# Altium PCB Teclado_V2.PcbDoc (part 1 of 2)
Units mm, origin at the board's own origin, x right, y up, seen from the top; angles counter-clockwise.
Board outline 315 x 134.96 mm, 2 copper layers (Top Layer, Bottom Layer); 272 components, 196 nets, 917 pads, 600 vias.
Unrouted connection lines stored in the file: 43.
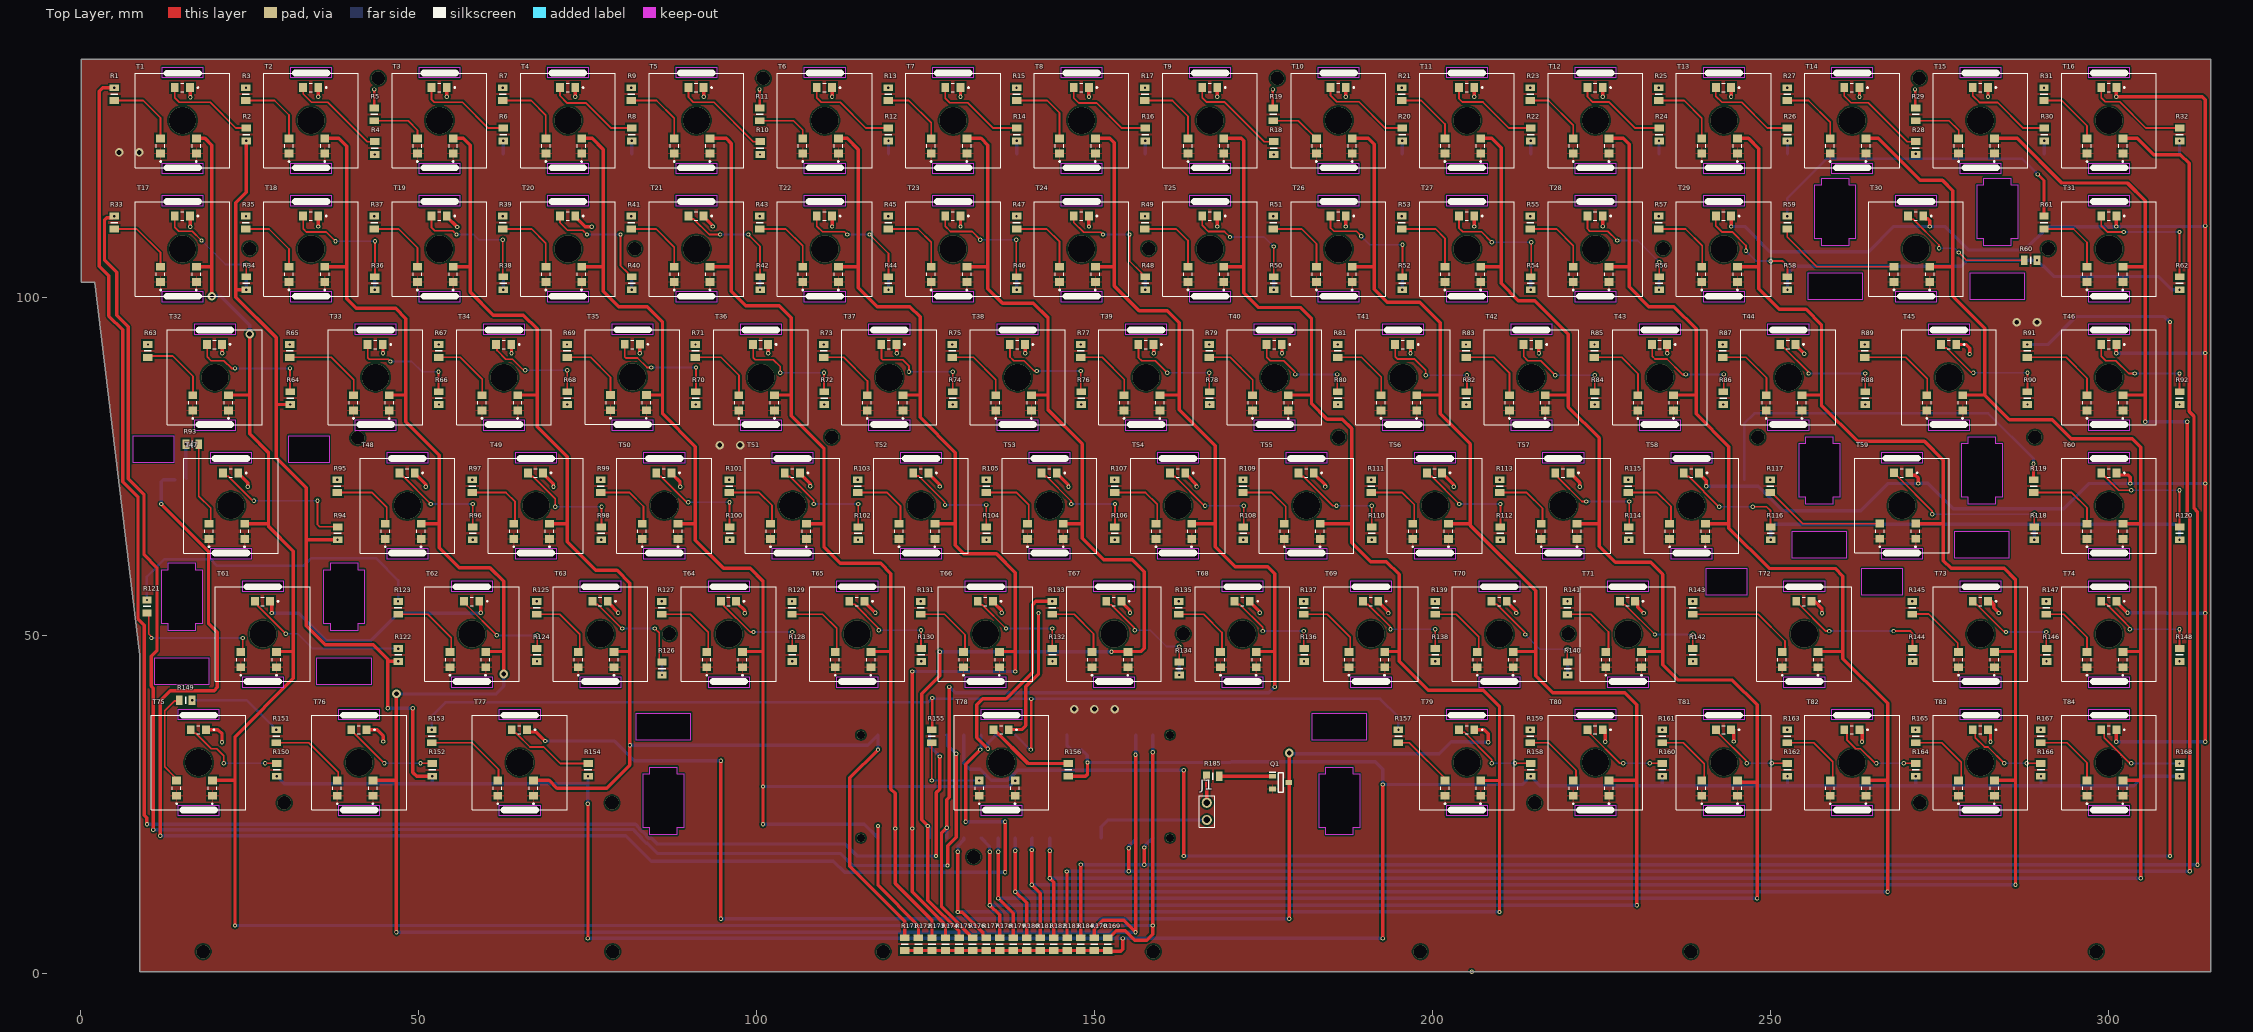
[diagram p0: Top Layer view]
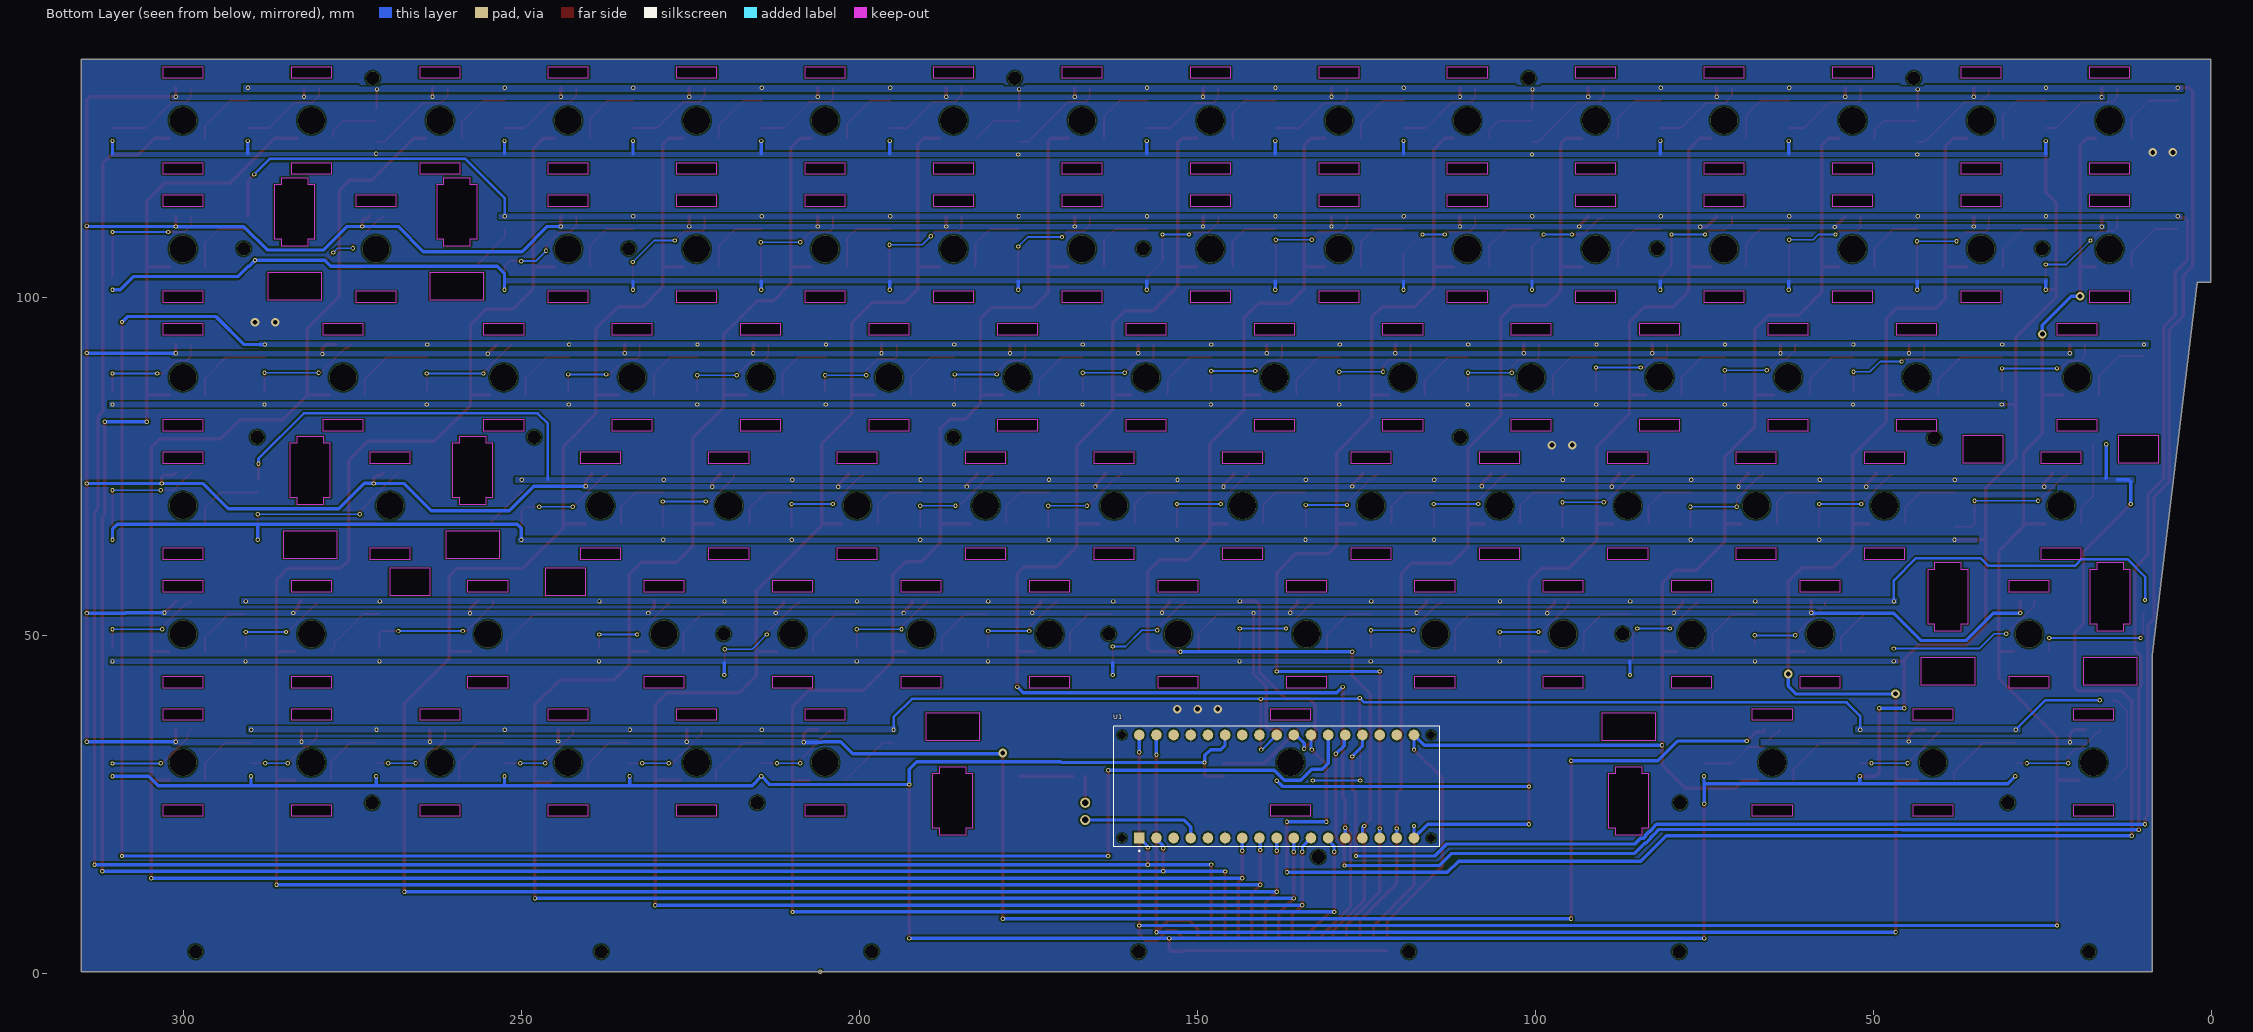
[diagram p1: Bottom Layer view, seen from below]

## Layer stack, top to bottom
Top Solder: solder mask 0.0102, Solder Resist, Dk 3.5
Top Layer: signal copper 0.0356
Dielectric 1: dielectric 0.32, FR-4, Dk 4.8
Bottom Layer: signal copper 0.0356
Bottom Solder: solder mask 0.0102, Solder Resist, Dk 3.5

## Board outline
0.127,102.282 2.127,102.282 8.731,47.14 8.731,0.321 315.127,0.321 315.127,135.282 0.127,135.282
cut-out: 240.519,59.982 246.519,59.982 246.519,55.982 240.519,55.982
cut-out: 263.529,59.982 269.529,59.982 269.529,55.982 263.529,55.982
cut-out: 257.564,117.722 261.564,117.722 261.564,116.722 262.564,116.722 262.564,108.722 261.564,108.722 261.564,107.722 257.564,107.722 257.564,108.722 256.564,108.722 256.564,116.722 257.564,116.722
cut-out: 255.565,103.722 263.565,103.722 263.565,99.722 255.565,99.722
cut-out: 7.793,79.618 13.793,79.618 13.793,75.618 7.793,75.618
cut-out: 188.221,20.582 184.221,20.582 184.221,21.582 183.221,21.582 183.221,29.582 184.221,29.582 184.221,30.582 188.221,30.582 188.221,29.582 189.221,29.582 189.221,21.582 188.221,21.582
cut-out: 190.221,34.582 182.221,34.582 182.221,38.582 190.221,38.582
cut-out: 255.257,79.482 259.257,79.482 259.257,78.482 260.257,78.482 260.257,70.482 259.257,70.482 259.257,69.482 255.257,69.482 255.257,70.482 254.257,70.482 254.257,78.482 255.257,78.482
cut-out: 277.281,65.482 285.281,65.482 285.281,61.482 277.281,61.482
cut-out: 279.281,79.482 283.281,79.482 283.281,78.482 284.281,78.482 284.281,70.482 283.281,70.482 283.281,69.482 279.281,69.482 279.281,70.482 278.281,70.482 278.281,78.482 279.281,78.482
cut-out: 281.569,117.722 285.569,117.722 285.569,116.722 286.569,116.722 286.569,108.722 285.569,108.722 285.569,107.722 281.569,107.722 281.569,108.722 280.569,108.722 280.569,116.722 281.569,116.722
cut-out: 279.569,103.722 287.569,103.722 287.569,99.722 279.569,99.722
cut-out: 253.257,65.482 261.257,65.482 261.257,61.482 253.257,61.482
cut-out: 36.985,60.782 40.985,60.782 40.985,59.782 41.985,59.782 41.985,51.782 40.985,51.782 40.985,50.782 36.985,50.782 36.985,51.782 35.985,51.782 35.985,59.782 36.985,59.782
cut-out: 12.985,60.782 16.985,60.782 16.985,59.782 17.985,59.782 17.985,51.782 16.985,51.782 16.985,50.782 12.985,50.782 12.985,51.782 11.985,51.782 11.985,59.782 12.985,59.782
cut-out: 34.985,46.782 42.985,46.782 42.985,42.782 34.985,42.782
cut-out: 30.793,79.618 36.793,79.618 36.793,75.618 30.793,75.618
cut-out: 10.985,46.782 18.985,46.782 18.985,42.782 10.985,42.782
cut-out: 88.235,20.582 84.235,20.582 84.235,21.582 83.235,21.582 83.235,29.582 84.235,29.582 84.235,30.582 88.235,30.582 88.235,29.582 89.235,29.582 89.235,21.582 88.235,21.582
cut-out: 90.235,34.582 82.235,34.582 82.235,38.582 90.235,38.582

## Design rules (kind name [scope] priority, off if disabled: settings)
Clearance [All] p1: gap=0.254 ignorepadtopadclearanceinfootprint=FALSE except(0: Arc-Hole Track-Hole SMDPad-Hole THPad-Hole Via-Hole Fill-Hole Poly-Hole Region-Hole Text-Hole)
PlaneConnect [All] p1: planeconnectstyle=Direct reliefexpansion=0.508 reliefentries=4 reliefconductorwidth=0.254 reliefairgap=0.254
PolygonConnect [All] p1: thpad.connectstyle=Relief thpad.reliefconductorwidth=0.254 thpad.reliefentries=4 thpad.polygonreliefangle="90 Angle" thpad.airgapwidth=0.254 smdpad.connectstyle=Relief smdpad.reliefconductorwidth=0.254 smdpad.reliefentries=4 smdpad.polygonreliefangle="90 Angle" smdpad.airgapwidth=0.254 via.connectstyle=Direct via.reliefconductorwidth=0.254 via.reliefentries=4 via.polygonreliefangle="90 Angle" via.airgapwidth=0.254
RoutingVias [All] p1: holewidth=0.35 width=0.635 viastyle="Through Hole" minholewidth=0.35 minwidth=0.635 maxholewidth=0.711 maxwidth=1.27
SolderMaskExpansion [All] p1: expansion=0.102 istentingtop=FALSE
Width [All] p1: maxlimit=0.5 minlimit=0.254 preferedwidth=0.254 minimp=50.000000 maximp=50.000000 favimp=50.000000
29 further rules are at their usual default settings.

## Components (designator, comment, footprint, x,y, rotation, side; value= is the part's Value field where it differs from the comment)
J1 "2P" 2P 166.624,25.301 r270 top
Q1 "MMBT2222A" MMBT2222A 176.088,28.288 r0 top
R1 "500" "Res 0805" 5,130.155 r90 top
R2 "560" "Res 0805" 24.5,124.155 r270 top
R3 "500" "Res 0805" 24.5,130.155 r90 top
R4 "560" "Res 0805" 43.5,122.155 r270 top
R5 "500" "Res 0805" 43.5,127.155 r90 top
R6 "560" "Res 0805" 62.5,124.155 r270 top
R7 "500" "Res 0805" 62.5,130.155 r90 top
R8 "560" "Res 0805" 81.5,124.155 r270 top
R9 "500" "Res 0805" 81.5,130.155 r90 top
R10 "560" "Res 0805" 100.5,122.155 r270 top
R11 "500" "Res 0805" 100.5,127.155 r90 top
R12 "560" "Res 0805" 119.5,124.155 r270 top
R13 "500" "Res 0805" 119.5,130.155 r90 top
R14 "560" "Res 0805" 138.5,124.155 r270 top
R15 "500" "Res 0805" 138.5,130.155 r90 top
R16 "560" "Res 0805" 157.5,124.155 r270 top
R17 "500" "Res 0805" 157.5,130.155 r90 top
R18 "560" "Res 0805" 176.5,122.155 r270 top
R19 "500" "Res 0805" 176.5,127.155 r90 top
R20 "560" "Res 0805" 195.5,124.155 r270 top
R21 "500" "Res 0805" 195.5,130.155 r90 top
R22 "560" "Res 0805" 214.5,124.155 r270 top
R23 "500" "Res 0805" 214.5,130.155 r90 top
R24 "560" "Res 0805" 233.5,124.155 r270 top
R25 "500" "Res 0805" 233.5,130.155 r90 top
R26 "560" "Res 0805" 252.5,124.155 r270 top
R27 "500" "Res 0805" 252.5,130.155 r90 top
R28 "560" "Res 0805" 271.5,122.155 r270 top
R29 "500" "Res 0805" 271.5,127.155 r90 top
R30 "560" "Res 0805" 290.5,124.155 r270 top
R31 "500" "Res 0805" 290.5,130.155 r90 top
R32 "560" "Res 0805" 310.5,124.155 r270 top
R33 "500" "Res 0805" 5,111.155 r90 top
R34 "560" "Res 0805" 24.5,102.155 r270 top
R35 "500" "Res 0805" 24.5,111.155 r90 top
R36 "560" "Res 0805" 43.5,102.155 r270 top
R37 "500" "Res 0805" 43.5,111.155 r90 top
R38 "560" "Res 0805" 62.5,102.155 r270 top
R39 "500" "Res 0805" 62.5,111.155 r90 top
R40 "560" "Res 0805" 81.5,102.155 r270 top
R41 "500" "Res 0805" 81.5,111.155 r90 top
R42 "560" "Res 0805" 100.5,102.155 r270 top
R43 "500" "Res 0805" 100.5,111.155 r90 top
R44 "560" "Res 0805" 119.5,102.155 r270 top
R45 "500" "Res 0805" 119.5,111.155 r90 top
R46 "560" "Res 0805" 138.5,102.155 r270 top
R47 "500" "Res 0805" 138.5,111.155 r90 top
R48 "560" "Res 0805" 157.5,102.155 r270 top
R49 "500" "Res 0805" 157.5,111.155 r90 top
R50 "560" "Res 0805" 176.5,102.155 r270 top
R51 "500" "Res 0805" 176.5,111.155 r90 top
R52 "560" "Res 0805" 195.5,102.155 r270 top
R53 "500" "Res 0805" 195.5,111.155 r90 top
R54 "560" "Res 0805" 214.5,102.155 r270 top
R55 "500" "Res 0805" 214.5,111.155 r90 top
R56 "560" "Res 0805" 233.5,102.155 r270 top
R57 "500" "Res 0805" 233.5,111.155 r90 top
R58 "560" "Res 0805" 252.5,102.155 r270 top
R59 "500" "Res 0805" 252.5,111.155 r90 top
R60 "560" "Res 0805" 288.5,105.539 r0 top
R61 "500" "Res 0805" 290.5,111.155 r90 top
R62 "560" "Res 0805" 310.5,102.155 r270 top
R63 "500" "Res 0805" 10,92.155 r90 top
R64 "560" "Res 0805" 31,85.155 r270 top
R65 "500" "Res 0805" 31,92.155 r90 top
R66 "560" "Res 0805" 53,85.155 r270 top
R67 "500" "Res 0805" 53,92.155 r90 top
R68 "560" "Res 0805" 72,85.155 r270 top
R69 "500" "Res 0805" 72,92.155 r90 top
R70 "560" "Res 0805" 91,85.155 r270 top
R71 "500" "Res 0805" 91,92.155 r90 top
R72 "560" "Res 0805" 110,85.155 r270 top
R73 "500" "Res 0805" 110,92.155 r90 top
R74 "560" "Res 0805" 129,85.155 r270 top
R75 "500" "Res 0805" 129,92.155 r90 top
R76 "560" "Res 0805" 148,85.155 r270 top
R77 "500" "Res 0805" 148,92.155 r90 top
R78 "560" "Res 0805" 167,85.155 r270 top
R79 "500" "Res 0805" 167,92.155 r90 top
R80 "560" "Res 0805" 186,85.155 r270 top
R81 "500" "Res 0805" 186,92.155 r90 top
R82 "560" "Res 0805" 205,85.155 r270 top
R83 "500" "Res 0805" 205,92.155 r90 top
R84 "560" "Res 0805" 224,85.155 r270 top
R85 "500" "Res 0805" 224,92.155 r90 top
R86 "560" "Res 0805" 243,85.155 r270 top
R87 "500" "Res 0805" 243,92.155 r90 top
R88 "560" "Res 0805" 264,85.155 r270 top
R89 "500" "Res 0805" 264,92.155 r90 top
R90 "560" "Res 0805" 288,85.155 r270 top
R91 "500" "Res 0805" 288,92.155 r90 top
R92 "560" "Res 0805" 310.5,85.155 r270 top
R93 "500" "Res 0805" 16.526,78.362 r180 top
R94 "560" "Res 0805" 38,65.155 r270 top
R95 "500" "Res 0805" 38,72.155 r90 top
R96 "560" "Res 0805" 58,65.155 r270 top
R97 "500" "Res 0805" 58,72.155 r90 top
R98 "560" "Res 0805" 77,65.155 r270 top
R99 "500" "Res 0805" 77,72.155 r90 top
R100 "560" "Res 0805" 96,65.155 r270 top
R101 "500" "Res 0805" 96,72.155 r90 top
R102 "560" "Res 0805" 115,65.155 r270 top
R103 "500" "Res 0805" 115,72.155 r90 top
R104 "560" "Res 0805" 134,65.155 r270 top
R105 "500" "Res 0805" 134,72.155 r90 top
R106 "560" "Res 0805" 153,65.155 r270 top
R107 "500" "Res 0805" 153,72.155 r90 top
R108 "560" "Res 0805" 172,65.155 r270 top
R109 "500" "Res 0805" 172,72.155 r90 top
R110 "560" "Res 0805" 191,65.155 r270 top
R111 "500" "Res 0805" 191,72.155 r90 top
R112 "560" "Res 0805" 210,65.155 r270 top
R113 "500" "Res 0805" 210,72.155 r90 top
R114 "560" "Res 0805" 229,65.155 r270 top
R115 "500" "Res 0805" 229,72.155 r90 top
R116 "560" "Res 0805" 250,65.155 r270 top
R117 "500" "Res 0805" 250,72.155 r90 top
R118 "560" "Res 0805" 289,65.155 r270 top
R119 "500" "Res 0805" 289,72.155 r90 top
R120 "560" "Res 0805" 310.5,65.155 r270 top
R121 "500" "Res 0805" 9.86,54.356 r90 top
R122 "560" "Res 0805" 47,47.155 r270 top
R123 "500" "Res 0805" 47,54.155 r90 top
R124 "560" "Res 0805" 67.5,47.155 r270 top
R125 "500" "Res 0805" 67.5,54.155 r90 top
R126 "560" "Res 0805" 86,45.155 r270 top
R127 "500" "Res 0805" 86,54.155 r90 top
R128 "560" "Res 0805" 105.283,47.155 r270 top
R129 "500" "Res 0805" 105.283,54.155 r90 top
R130 "560" "Res 0805" 124.341,47.155 r270 top
R131 "500" "Res 0805" 124.341,54.155 r90 top
R132 "560" "Res 0805" 143.764,47.155 r270 top
R133 "500" "Res 0805" 143.764,54.155 r90 top
R134 "560" "Res 0805" 162.5,45.155 r270 top
R135 "500" "Res 0805" 162.5,54.155 r90 top
R136 "560" "Res 0805" 180.983,47.155 r270 top
R137 "500" "Res 0805" 180.983,54.155 r90 top
R138 "560" "Res 0805" 200.414,47.155 r270 top
R139 "500" "Res 0805" 200.414,54.155 r90 top
R140 "560" "Res 0805" 220,45.155 r270 top
R141 "500" "Res 0805" 220,54.155 r90 top
R142 "560" "Res 0805" 238.514,47.155 r270 top
R143 "500" "Res 0805" 238.514,54.155 r90 top
R144 "560" "Res 0805" 271,47.155 r270 top
R145 "500" "Res 0805" 271,54.155 r90 top
R146 "560" "Res 0805" 290.83,47.155 r270 top
R147 "500" "Res 0805" 290.83,54.155 r90 top
R148 "560" "Res 0805" 310.5,47.155 r270 top
R149 "500" "Res 0805" 15.571,40.442 r0 top
R150 "560" "Res 0805" 29,30.155 r270 top
R151 "500" "Res 0805" 29,35.155 r90 top
R152 "560" "Res 0805" 52,30.155 r270 top
R153 "500" "Res 0805" 52,35.155 r90 top
R154 "560" "Res 0805" 75.057,30.155 r270 top
R155 "500" "Res 0805" 125.953,35.155 r90 top
R156 "560" "Res 0805" 146.117,30.155 r270 top
R157 "500" "Res 0805" 195,35.155 r90 top
R158 "560" "Res 0805" 214.5,30.155 r270 top
R159 "500" "Res 0805" 214.5,35.155 r90 top
R160 "560" "Res 0805" 234,30.155 r270 top
R161 "500" "Res 0805" 234,35.155 r90 top
R162 "560" "Res 0805" 252.5,30.155 r270 top
R163 "500" "Res 0805" 252.5,35.155 r90 top
R164 "560" "Res 0805" 271.5,30.155 r270 top
R165 "500" "Res 0805" 271.5,35.155 r90 top
R166 "560" "Res 0805" 290,30.155 r270 top
R167 "500" "Res 0805" 290,35.155 r90 top
R168 "560" "Res 0805" 310.5,30.155 r270 top
R169 "10k" "Res 0805" 151.991,4.409 r90 top
R170 "10k" "Res 0805" 149.991,4.409 r90 top
R171 "10k" "Res 0805" 121.991,4.409 r90 top
R172 "10k" "Res 0805" 123.991,4.409 r90 top
R173 "10k" "Res 0805" 125.991,4.409 r90 top
R174 "10k" "Res 0805" 127.991,4.409 r90 top
R175 "10k" "Res 0805" 129.991,4.409 r90 top
R176 "10k" "Res 0805" 131.991,4.409 r90 top
R177 "10k" "Res 0805" 133.991,4.409 r90 top
R178 "10k" "Res 0805" 135.991,4.409 r90 top
R179 "10k" "Res 0805" 137.991,4.409 r90 top
R180 "10k" "Res 0805" 139.991,4.409 r90 top
R181 "10k" "Res 0805" 141.991,4.409 r90 top
R182 "10k" "Res 0805" 143.991,4.409 r90 top
R183 "10k" "Res 0805" 145.991,4.409 r90 top
R184 "10k" "Res 0805" 147.991,4.409 r90 top
R185 "1k" "Res 0805" 167.513,29.238 r180 top
T1 "Interruptor óptico Keychron de bajo perfil" "Interruptor óptico Keychron de bajo perfil" 8.105,119.246 r0 top
T2 "Interruptor óptico Keychron de bajo perfil" "Interruptor óptico Keychron de bajo perfil" 27.104,119.25 r0 top
T3 "Interruptor óptico Keychron de bajo perfil" "Interruptor óptico Keychron de bajo perfil" 46.104,119.25 r0 top
T4 "Interruptor óptico Keychron de bajo perfil" "Interruptor óptico Keychron de bajo perfil" 65.104,119.25 r0 top
T5 "Interruptor óptico Keychron de bajo perfil" "Interruptor óptico Keychron de bajo perfil" 84.104,119.25 r0 top
T6 "Interruptor óptico Keychron de bajo perfil" "Interruptor óptico Keychron de bajo perfil" 103.104,119.25 r0 top
T7 "Interruptor óptico Keychron de bajo perfil" "Interruptor óptico Keychron de bajo perfil" 122.104,119.25 r0 top
T8 "Interruptor óptico Keychron de bajo perfil" "Interruptor óptico Keychron de bajo perfil" 141.104,119.25 r0 top
T9 "Interruptor óptico Keychron de bajo perfil" "Interruptor óptico Keychron de bajo perfil" 160.104,119.25 r0 top
T10 "Interruptor óptico Keychron de bajo perfil" "Interruptor óptico Keychron de bajo perfil" 179.104,119.25 r0 top
T11 "Interruptor óptico Keychron de bajo perfil" "Interruptor óptico Keychron de bajo perfil" 198.104,119.25 r0 top
T12 "Interruptor óptico Keychron de bajo perfil" "Interruptor óptico Keychron de bajo perfil" 217.104,119.25 r0 top
T13 "Interruptor óptico Keychron de bajo perfil" "Interruptor óptico Keychron de bajo perfil" 236.104,119.25 r0 top
T14 "Interruptor óptico Keychron de bajo perfil" "Interruptor óptico Keychron de bajo perfil" 255.104,119.25 r0 top
T15 "Interruptor óptico Keychron de bajo perfil" "Interruptor óptico Keychron de bajo perfil" 274.104,119.25 r0 top
T16 "Interruptor óptico Keychron de bajo perfil" "Interruptor óptico Keychron de bajo perfil" 293.106,119.25 r0 top
T17 "Interruptor óptico Keychron de bajo perfil" "Interruptor óptico Keychron de bajo perfil" 8.103,100.244 r0 top
T18 "Interruptor óptico Keychron de bajo perfil" "Interruptor óptico Keychron de bajo perfil" 27.104,100.25 r0 top
T19 "Interruptor óptico Keychron de bajo perfil" "Interruptor óptico Keychron de bajo perfil" 46.104,100.248 r0 top
T20 "Interruptor óptico Keychron de bajo perfil" "Interruptor óptico Keychron de bajo perfil" 65.104,100.25 r0 top
T21 "Interruptor óptico Keychron de bajo perfil" "Interruptor óptico Keychron de bajo perfil" 84.104,100.25 r0 top
T22 "Interruptor óptico Keychron de bajo perfil" "Interruptor óptico Keychron de bajo perfil" 103.104,100.25 r0 top
T23 "Interruptor óptico Keychron de bajo perfil" "Interruptor óptico Keychron de bajo perfil" 122.104,100.25 r0 top
T24 "Interruptor óptico Keychron de bajo perfil" "Interruptor óptico Keychron de bajo perfil" 141.104,100.25 r0 top
T25 "Interruptor óptico Keychron de bajo perfil" "Interruptor óptico Keychron de bajo perfil" 160.104,100.25 r0 top
T26 "Interruptor óptico Keychron de bajo perfil" "Interruptor óptico Keychron de bajo perfil" 179.104,100.25 r0 top
T27 "Interruptor óptico Keychron de bajo perfil" "Interruptor óptico Keychron de bajo perfil" 198.104,100.25 r0 top
T28 "Interruptor óptico Keychron de bajo perfil" "Interruptor óptico Keychron de bajo perfil" 217.104,100.25 r0 top
T29 "Interruptor óptico Keychron de bajo perfil" "Interruptor óptico Keychron de bajo perfil" 236.104,100.25 r0 top
T30 "Interruptor óptico Keychron de bajo perfil" "Interruptor óptico Keychron de bajo perfil" 264.544,100.25 r0 top
T31 "Interruptor óptico Keychron de bajo perfil" "Interruptor óptico Keychron de bajo perfil" 293.104,100.25 r0 top
T32 "Interruptor óptico Keychron de bajo perfil" "Interruptor óptico Keychron de bajo perfil" 12.864,81.25 r0 top
T33 "Interruptor óptico Keychron de bajo perfil" "Interruptor óptico Keychron de bajo perfil" 36.644,81.25 r0 top
T34 "Interruptor óptico Keychron de bajo perfil" "Interruptor óptico Keychron de bajo perfil" 55.644,81.25 r0 top
T35 "Interruptor óptico Keychron de bajo perfil" "Interruptor óptico Keychron de bajo perfil" 74.675,81.275 r0 top
T36 "Interruptor óptico Keychron de bajo perfil" "Interruptor óptico Keychron de bajo perfil" 93.644,81.25 r0 top
T37 "Interruptor óptico Keychron de bajo perfil" "Interruptor óptico Keychron de bajo perfil" 112.644,81.25 r0 top
T38 "Interruptor óptico Keychron de bajo perfil" "Interruptor óptico Keychron de bajo perfil" 131.646,81.25 r0 top
T39 "Interruptor óptico Keychron de bajo perfil" "Interruptor óptico Keychron de bajo perfil" 150.644,81.25 r0 top
T40 "Interruptor óptico Keychron de bajo perfil" "Interruptor óptico Keychron de bajo perfil" 169.644,81.25 r0 top
T41 "Interruptor óptico Keychron de bajo perfil" "Interruptor óptico Keychron de bajo perfil" 188.644,81.25 r0 top
T42 "Interruptor óptico Keychron de bajo perfil" "Interruptor óptico Keychron de bajo perfil" 207.644,81.25 r0 top
T43 "Interruptor óptico Keychron de bajo perfil" "Interruptor óptico Keychron de bajo perfil" 226.644,81.25 r0 top
T44 "Interruptor óptico Keychron de bajo perfil" "Interruptor óptico Keychron de bajo perfil" 245.644,81.25 r0 top
T45 "Interruptor óptico Keychron de bajo perfil" "Interruptor óptico Keychron de bajo perfil" 269.404,81.25 r0 top
T46 "Interruptor óptico Keychron de bajo perfil" "Interruptor óptico Keychron de bajo perfil" 293.106,81.25 r0 top
T47 "Interruptor óptico Keychron de bajo perfil" "Interruptor óptico Keychron de bajo perfil" 15.255,62.25 r0 top
T48 "Interruptor óptico Keychron de bajo perfil" "Interruptor óptico Keychron de bajo perfil" 41.354,62.25 r0 top
T49 "Interruptor óptico Keychron de bajo perfil" "Interruptor óptico Keychron de bajo perfil" 60.354,62.25 r0 top
T50 "Interruptor óptico Keychron de bajo perfil" "Interruptor óptico Keychron de bajo perfil" 79.356,62.25 r0 top
T51 "Interruptor óptico Keychron de bajo perfil" "Interruptor óptico Keychron de bajo perfil" 98.354,62.25 r0 top
T52 "Interruptor óptico Keychron de bajo perfil" "Interruptor óptico Keychron de bajo perfil" 117.356,62.25 r0 top
T53 "Interruptor óptico Keychron de bajo perfil" "Interruptor óptico Keychron de bajo perfil" 136.354,62.25 r0 top
T54 "Interruptor óptico Keychron de bajo perfil" "Interruptor óptico Keychron de bajo perfil" 155.354,62.25 r0 top
T55 "Interruptor óptico Keychron de bajo perfil" "Interruptor óptico Keychron de bajo perfil" 174.354,62.25 r0 top
T56 "Interruptor óptico Keychron de bajo perfil" "Interruptor óptico Keychron de bajo perfil" 193.354,62.25 r0 top
T57 "Interruptor óptico Keychron de bajo perfil" "Interruptor óptico Keychron de bajo perfil" 212.356,62.25 r0 top
T58 "Interruptor óptico Keychron de bajo perfil" "Interruptor óptico Keychron de bajo perfil" 231.354,62.25 r0 top
T59 "Interruptor óptico Keychron de bajo perfil" "Interruptor óptico Keychron de bajo perfil" 262.453,62.256 r0 top
T60 "Interruptor óptico Keychron de bajo perfil" "Interruptor óptico Keychron de bajo perfil" 293.106,62.25 r0 top
T61 "Interruptor óptico Keychron de bajo perfil" "Interruptor óptico Keychron de bajo perfil" 19.965,43.248 r0 top
T62 "Interruptor óptico Keychron de bajo perfil" "Interruptor óptico Keychron de bajo perfil" 50.904,43.25 r0 top
T63 "Interruptor óptico Keychron de bajo perfil" "Interruptor óptico Keychron de bajo perfil" 69.904,43.25 r0 top
T64 "Interruptor óptico Keychron de bajo perfil" "Interruptor óptico Keychron de bajo perfil" 88.906,43.25 r0 top
T65 "Interruptor óptico Keychron de bajo perfil" "Interruptor óptico Keychron de bajo perfil" 107.906,43.25 r0 top
T66 "Interruptor óptico Keychron de bajo perfil" "Interruptor óptico Keychron de bajo perfil" 126.906,43.25 r0 top
T67 "Interruptor óptico Keychron de bajo perfil" "Interruptor óptico Keychron de bajo perfil" 145.906,43.25 r0 top
T68 "Interruptor óptico Keychron de bajo perfil" "Interruptor óptico Keychron de bajo perfil" 164.904,43.25 r0 top
T69 "Interruptor óptico Keychron de bajo perfil" "Interruptor óptico Keychron de bajo perfil" 183.906,43.25 r0 top
T70 "Interruptor óptico Keychron de bajo perfil" "Interruptor óptico Keychron de bajo perfil" 202.904,43.25 r0 top
T71 "Interruptor óptico Keychron de bajo perfil" "Interruptor óptico Keychron de bajo perfil" 221.906,43.25 r0 top
T72 "Interruptor óptico Keychron de bajo perfil" "Interruptor óptico Keychron de bajo perfil" 248.006,43.25 r0 top
T73 "Interruptor óptico Keychron de bajo perfil" "Interruptor óptico Keychron de bajo perfil" 274.106,43.25 r0 top
T74 "Interruptor óptico Keychron de bajo perfil" "Interruptor óptico Keychron de bajo perfil" 293.106,43.25 r0 top
T75 "Interruptor óptico Keychron de bajo perfil" "Interruptor óptico Keychron de bajo perfil" 10.48,24.25 r0 top
T76 "Interruptor óptico Keychron de bajo perfil" "Interruptor óptico Keychron de bajo perfil" 34.229,24.25 r0 top
T77 "Interruptor óptico Keychron de bajo perfil" "Interruptor óptico Keychron de bajo perfil" 57.979,24.25 r0 top
T78 "Interruptor óptico Keychron de bajo perfil" "Interruptor óptico Keychron de bajo perfil" 129.23,24.25 r0 top
T79 "Interruptor óptico Keychron de bajo perfil" "Interruptor óptico Keychron de bajo perfil" 198.105,24.25 r0 top
T80 "Interruptor óptico Keychron de bajo perfil" "Interruptor óptico Keychron de bajo perfil" 217.105,24.25 r0 top
T81 "Interruptor óptico Keychron de bajo perfil" "Interruptor óptico Keychron de bajo perfil" 236.105,24.25 r0 top
T82 "Interruptor óptico Keychron de bajo perfil" "Interruptor óptico Keychron de bajo perfil" 255.104,24.25 r0 top
T83 "Interruptor óptico Keychron de bajo perfil" "Interruptor óptico Keychron de bajo perfil" 274.104,24.25 r0 top
T84 "Interruptor óptico Keychron de bajo perfil" "Interruptor óptico Keychron de bajo perfil" 293.104,24.25 r0 top
U1 "A000053" ARDUINO_A000053 138.303,27.714 r90 bottom

## Footprints (in the part's own frame and the unit in brackets; to place one, negate y for a bottom-side part, rotate by r counter-clockwise, add the part's x,y. Pads: shape width x height; smd on the part's side, far side on the other; paste and mask are expansions set on the pad)
2P [mil]
  round 59.09 hole 38: 1(0,0) 2(100,0)
  silkscreen extent -42,-45 142,45, body extent -42,-45 142,47, height 409
ARDUINO_A000053 [mil]
  rect 62x62 smd: 1(-300,800)
  round 62 smd: 2(-300,700) 3(-300,600) 4(-300,500) 5(-300,400) 6(-300,300) 7(-300,200) 8(-300,100) 9(-300,0) 10(-300,-100) 11(-300,-200) 12(-300,-300) 13(-300,-400) 14(-300,-500) 15(-300,-600) 16(-300,-700) 17(-300,-800) 18(300,-800) 19(300,-700) 20(300,-600) 21(300,-500) 22(300,-400) 23(300,-300) 24(300,-200) 25(300,-100) 26(300,0) 27(300,100) 28(300,200) 29(300,300) 30(300,400) 31(300,500) 32(300,600) 33(300,700) 34(300,800)
  round 47.24 hole 47.24 unplated: ""(-300,-900) ""(-300,900) ""(300,-900) ""(300,900)
  silkscreen extent -379,-950 350,950, body extent -350,-1002 350,950
"Interruptor óptico Keychron de bajo perfil" [mm]
  rect 1.3x1.15 smd: 1(3.739,4.346) 2(9.039,4.346) 4(3.739,2.096) 5(9.039,2.096)
  rect 1.15x1.3 smd: 3(5.829,11.856) 6(8.079,11.856)
  Keep-Out Layer board cut-out: 4,-0.9 4,0.7 10,0.7 10,-0.9
  Keep-Out Layer board cut-out: 4,13.3 4,14.9 10,14.9 10,13.3
  silkscreen extent 0,0 14,14, body extent 3.12,2.22 9.66,12.48, height 0.73
MMBT2222A [mm]
  rect 1x0.7 smd: 1(0.267,0.95) 2(0.267,-0.95) 3(2.667,0)
  silkscreen extent -0.23,-1.46 1.82,1.55, body extent 0.09,-1.45 2.49,1.47, height 1.2
"Res 0805" [mm]
  rect 1x1.4 smd: 1(-0.961,0.025) 2(0.939,0.025)
  silkscreen extent -0.01,-0.5 -0.01,0.55, body extent -1,-0.63 1,0.63, height 0.6

## Part data
R1 R2 R3 R4 R5 R6 R7 R8 R9 R10 R11 R12 R13 R14 R15 R16 R17 R18 R19 R20 R21 R22 R23 R24 R25 R26 R27 R28 R29 R30 R31 R32 R33 R34 R35 R36 R37 R38 R39 R40 R41 R42 R43 R44 R45 R46 R47 R48 R49 R50 R51 R52 R53 R54 R55 R56 R57 R58 R59 R60 R61 R62 R63 R64 R65 R66 R67 R68 R69 R70 R71 R72 R73 R74 R75 R76 R77 R78 R79 R80 R81 R82 R83 R84 R85 R86 R87 R88 R89 R90 R91 R92 R93 R94 R95 R96 R97 R98 R99 R100 R101 R102 R103 R104 R105 R106 R107 R108 R109 R110 R111 R112 R113 R114 R115 R116 R117 R118 R119 R120 R121 R122 R123 R124 R125 R126 R127 R128 R129 R130 R131 R132 R133 R134 R135 R136 R137 R138 R139 R140 R141 R142 R143 R144 R145 R146 R147 R148 R149 R150 R151 R152 R153 R154 R155 R156 R157 R158 R159 R160 R161 R162 R163 R164 R165 R166 R167 R168 R169 R170 R171 R172 R173 R174 R175 R176 R177 R178 R179 R180 R181 R182 R183 R184 R185: library part "Res 0805"
U1: "Microcontroller board based on the ATmega32u4", Package="Non-Standard Arduino", Check_prices=https://www.snapeda.com/parts/Arduino%20Micro/Arduino/view-part/?ref=eda, MF=Arduino, MP="Arduino Micro", SnapEDA_Link=https://www.snapeda.com/parts/Arduino%20Micro/Arduino/view-part/?ref=snap

## Via types
v1: diameter 0.635, hole 0.35, Top Layer to Bottom Layer, tented both sides, 473 vias
v2: diameter 4, hole 4, Top Layer to Bottom Layer, 84 vias
v3: diameter 2, hole 2, Top Layer to Bottom Layer, tented both sides, 29 vias
v4: diameter 1.27, hole 0.711, Top Layer to Bottom Layer, tented both sides, 14 vias

## Nets (pads, with @x,y where several pads share a name; then routed paths per layer and width w, separated by ;. In a path a pad name is that pad's centre, name@x,y a point inside that pad or via, vN(x,y) a via of type N, cw(c..) or ccw(c..) an arc to the next point about the centre after c; other vN are vias at no path point)
+5: R2.2 R4.2 R6.2 R8.2 R10.2 R12.2 R14.2 R16.2 R18.2 R20.2 R22.2 R24.2 R26.2 R28.2 R30.2 R32.2 R34.2 R36.2 R38.2 R40.2 R42.2 R44.2 R46.2 R48.2 R50.2 R52.2 R54.2 R56.2 R58.2 R60.2 R62.2 R64.2 R66.2 R68.2 R70.2 R72.2 R74.2 R76.2 R78.2 R80.2 R82.2 R84.2 R86.2 R88.2 R90.2 R92.2 R94.2 R96.2 R98.2 R100.2 R102.2 R104.2 R106.2 R108.2 R110.2 R112.2 R114.2 R116.2 R118.2 R120.2 R122.2 R124.2 R126.2 R128.2 R130.2 R132.2 R134.2 R136.2 R138.2 R140.2 R142.2 R144.2 R146.2 R148.2 R150.2 R152.2 R154.2 R156.2 R158.2 R160.2 R162.2 R164.2 R166.2 R168.2 R169.1 R170.1 R171.1 R172.1 R173.1 R174.1 R175.1 R176.1 R177.1 R178.1 R179.1 R180.1 R181.1 R182.1 R183.1 R184.1 U1.29 | length 726.2
  Top Layer w0.5: v1(24.525,101.216) 23.083,101.216 22.987,101.12 ; v1(24.525,123.216) 24.525,115.612 22.987,114.074 22.987,101.12 ; v1(31.025,84.216) 28.969,84.216 28.956,84.229 ; v1(38.025,64.216) 33.401,64.216 ; v1(45.466,39.271) 45.466,46.129 ; v1(47.025,46.216) 45.553,46.216 45.466,46.129 ; v1(49.149,39.271) 49.149,29.784 49.718,29.216 v1(52.025,29.216) ; v1(75.057,5.235) 75.083,5.26 75.083,25.148 v1(75.057,25.174) ; R171.1@121.966,3.447 R172.1@123.966,3.447 R173.1@125.966,3.447 R174.1@127.966,3.447 R175.1@129.966,3.447 R176.1@131.966,3.447 R177.1@133.966,3.447 R178.1@135.966,3.447 R179.1@137.966,3.447 R180.1@139.966,3.447 R181.1@141.966,3.447 R182.1@143.966,3.447 R183.1@145.966,3.447 R184.1@147.966,3.447 R170.1@149.966,3.447 R169.1@151.966,3.447 152.084,3.33 153.885,3.33 154.178,3.622 v1(154.178,5.235) ; R156.2@146.142,29.216 148.678,29.216 148.971,29.509 v1(148.971,31.27) ; v1(192.659,5.235) v1(192.659,28.004) ; 22.987,101.12 22.987,100.104 28.956,94.135 28.956,84.229 ; 28.956,84.229 28.956,76.355 33.401,71.91 33.401,64.216 ; 33.401,64.216 33.401,51.463 36.195,48.669 43.307,48.669 45.466,46.51 45.466,46.129
  Bottom Layer w0.5: 24.511,102.517 24.525,102.502 v1(24.525,101.216) ; 24.525,121.323 v1(24.525,123.216) ; v1(29.025,29.216) 30.146,28.095 52.054,28.095 ; v1(43.525,101.216) 43.525,102.502 ; v1(45.466,39.271) v1(49.149,39.271) ; v1(52.025,29.216) 52.025,28.123 52.054,28.095 ; v1(62.525,101.216) 62.525,102.502 ; 62.525,121.323 v1(62.525,123.216) ; v1(75.057,5.235) v1(154.178,5.235) v1(192.659,5.235) ; v1(75.057,25.174) 75.057,28.095 52.054,28.095 ; 75.082,28.095 v1(75.082,29.216) ; v1(81.525,101.216) 81.525,102.502 ; 81.525,121.323 v1(81.525,123.216) ; v1(86.025,44.216) 86.025,46.048 86.106,46.129 86.106,46.256 ; v1(100.525,101.216) 100.525,102.502 ; v1(119.525,101.216) 119.525,102.502 ; 119.525,121.323 v1(119.525,123.216) ; v1(138.525,101.216) 138.525,102.502 ; 138.525,121.323 v1(138.525,123.216) ; U1.29@145.923,35.334 145.936,35.32 145.936,33.796 146.558,33.175 148.082,33.175 148.945,32.311 148.945,31.295 v1(148.971,31.27) 170.198,31.27 170.325,31.397 191.516,31.397 192.659,30.254 v1(192.659,28.004) 213.277,28.004 214.489,29.216 v1(214.525,29.216) 215.9,27.841 233.934,27.841 ; v1(157.525,101.216) 157.525,102.502 ; 157.525,121.323 v1(157.525,123.216) ; v1(162.525,44.216) 162.525,46.048 ; v1(176.525,101.216) 176.525,102.502 ; v1(195.525,101.216) 195.525,102.502 ; 195.525,121.323 v1(195.525,123.216) ; v1(214.525,101.216) 214.525,102.502 ; 214.525,121.323 v1(214.525,123.216) ; v1(220.025,44.216) 220.025,46.048 ; v1(233.525,101.216) 233.525,102.502 ; 233.525,121.323 v1(233.525,123.216) ; v1(234.025,29.216) 234.025,27.932 233.934,27.841 ; v1(250.025,64.216) 250.025,65.903 250.618,66.496 289.025,66.496 ; v1(252.525,29.216) 252.525,27.918 252.603,27.841 ; v1(252.525,101.216) 252.525,103.582 253.603,104.66 278.241,104.66 279.146,105.565 v1(289.439,105.565) 290.31,104.693 290.431,104.693 291.973,103.152 307.467,103.152 309.403,101.216 v1(310.525,101.216) ; 252.525,121.323 v1(252.525,123.216) ; v1(271.525,29.216) 271.525,27.841 ; v1(289.025,64.216) 289.025,66.496 ; v1(290.025,29.216) 290.025,27.925 289.941,27.841 ; 290.525,121.323 v1(290.525,123.216) ; v1@310.515,64.216 310.515,65.814 309.833,66.496 289.025,66.496 ; 310.515,121.313 310.525,121.323 v1(310.525,123.216) ; v1(310.525,29.216) 305.159,29.216 303.784,27.841 289.941,27.841 ; 233.934,27.841 252.603,27.841 ; 252.603,27.841 271.526,27.841 ; 271.526,27.841 289.941,27.841
  other v1: 67.525,46.216 105.308,46.216 124.367,46.216 143.789,46.216 181.009,46.216 200.44,46.216 238.54,46.216 271.025,46.216 290.855,46.216 310.525,46.216 58.025,64.216 77.025,64.216 96.025,64.216 115.025,64.216 134.025,64.216 153.025,64.216 172.025,64.216 191.025,64.216 210.025,64.216 229.025,64.216 310.525,64.216 53.025,84.216 72.025,84.216 91.025,84.216 110.025,84.216 129.025,84.216 148.025,84.216 167.025,84.216 186.025,84.216 205.025,84.216 224.025,84.216 243.025,84.216 264.025,84.216 288.025,84.216 310.525,84.216 43.525,121.216 100.525,121.216 176.525,121.216 271.525,121.312
GND: Q1.2 T1.4 T1.5 T2.4 T2.5 T3.4 T3.5 T4.4 T4.5 T5.4 T5.5 T6.4 T6.5 T7.4 T7.5 T8.4 T8.5 T9.4 T9.5 T10.4 T10.5 T11.4 T11.5 T12.4 T12.5 T13.4 T13.5 T14.4 T14.5 T15.4 T15.5 T16.4 T16.5 T17.4 T17.5 T18.4 T18.5 T19.4 T19.5 T20.4 T20.5 T21.4 T21.5 T22.4 T22.5 T23.4 T23.5 T24.4 T24.5 T25.4 T25.5 T26.4 T26.5 T27.4 T27.5 T28.4 T28.5 T29.4 T29.5 T30.4 T30.5 T31.4 T31.5 T32.4 T32.5 T33.4 T33.5 T34.4 T34.5 T35.4 T35.5 T36.4 T36.5 T37.4 T37.5 T38.4 T38.5 T39.4 T39.5 T40.4 T40.5 T41.4 T41.5 T42.4 T42.5 T43.4 T43.5 T44.4 T44.5 T45.4 T45.5 T46.4 T46.5 T47.4 T47.5 T48.4 T48.5 T49.4 T49.5 T50.4 T50.5 T51.4 T51.5 T52.4 T52.5 T53.4 T53.5 T54.4 T54.5 T55.4 T55.5 T56.4 T56.5 T57.4 T57.5 T58.4 T58.5 T59.4 T59.5 T60.4 T60.5 T61.4 T61.5 T62.4 T62.5 T63.4 T63.5 T64.4 T64.5 T65.4 T65.5 T66.4 T66.5 T67.4 T67.5 T68.4 T68.5 T69.4 T69.5 T70.4 T70.5 T71.4 T71.5 T72.4 T72.5 T73.4 T73.5 T74.4 T74.5 T75.4 T75.5 T76.4 T76.5 T77.4 T77.5 T78.4 T78.5 T79.4 T79.5 T80.4 T80.5 T81.4 T81.5 T82.4 T82.5 T83.4 T83.5 T84.4 T84.5 U1.6 U1.31
  other v4: 147,39.155 150,39.155 153,39.155 94.57,78.216 97.57,78.216 286.436,96.404 289.436,96.404 5.702,121.518 8.702,121.518
NetJ1_1: J1.1 R185.2 | length 3.9
  Top Layer w0.5: R185.2@166.574,29.212 166.599,29.187 166.599,25.326 J1.1@166.624,25.301
NetJ1_2: J1.2 U1.4 | length 17.7
  Bottom Layer w0.5: U1.4@151.003,20.094 151.003,21.745 152.019,22.761 J1.2@166.624,22.761
NetQ1_1: Q1.1 R185.1 | length 7.9
  Top Layer w0.5: R185.1@168.474,29.212 168.487,29.225 Q1.1@176.355,29.225
NetQ1_3: Q1.3 T1.6 T2.6 T3.6 T4.6 T5.6 T6.6 T7.6 T8.6 T9.6 T10.6 T11.6 T12.6 T13.6 T14.6 T15.6 T16.6 T17.6 T18.6 T19.6 T20.6 T21.6 T22.6 T23.6 T24.6 T25.6 T26.6 T27.6 T28.6 T29.6 T30.6 T31.6 T32.6 T33.6 T34.6 T35.6 T36.6 T37.6 T38.6 T39.6 T40.6 T41.6 T42.6 T43.6 T44.6 T45.6 T46.6 T47.6 T48.6 T49.6 T50.6 T51.6 T52.6 T53.6 T54.6 T55.6 T56.6 T57.6 T58.6 T59.6 T60.6 T61.6 T62.6 T63.6 T64.6 T65.6 T66.6 T67.6 T68.6 T69.6 T70.6 T71.6 T72.6 T73.6 T74.6 T75.6 T76.6 T77.6 T78.6 T79.6 T80.6 T81.6 T82.6 T83.6 T84.6 | length 708
  Top Layer w0.5: T17.6@16.185,112.108 16.23,112.062 16.23,110.543 16.233,110.541 v1(16.23,110.538) ; T1.6@16.185,131.108 16.256,131.037 v1(16.256,129.695) ; T75.6@18.559,36.106 20.336,36.106 20.94,35.502 v1(20.94,34.252) ; v1(20.984,91.789) T32.6@20.984,93.131 ; T47.6@23.597,74.112 23.597,73.768 24.736,72.628 24.736,72.101 v1(24.762,72.076) ; v1(28.287,53.373) 28.289,53.375 T61.6@28.289,55.182 ; v1@35.185,110.589 T18.6@35.185,112.108 ; v1(35.185,129.766) T2.6@35.185,131.108 ; T76.6@42.308,36.106 43.872,36.106 44.788,35.19 v1(44.788,34.362) ; v1(44.754,91.789) T33.6@44.754,93.131 ; T48.6@49.645,74.099 49.645,73.819 51.062,72.401 51.062,72.063 v1(51.088,72.038) ; T19.6@54.185,112.108 54.185,112.027 55.728,110.484 v1(55.752,110.484) ; v1(54.185,129.766) T3.6@54.185,131.108 ; T62.6@59.189,55.182 59.189,53.417 v1(59.231,53.417) ; v1(63.754,91.789) T34.6@63.754,93.131 ; T77.6@66.164,36.132 66.164,35.987 66.383,35.768 67.42,35.768 v1(68.752,34.436) ; T49.6@68.632,74.112 68.632,73.832 69.944,72.519 69.944,72.097 v1(69.97,72.072) ; T20.6@73.185,112.108 73.185,112.029 74.666,110.547 75.612,110.547 v1(75.638,110.522) ; v1(73.185,129.766) T4.6@73.185,131.108 ; T63.6@78.189,55.182 78.189,54.825 79.502,53.511 79.502,53.421 v1(79.528,53.396) ; v1(82.754,91.789) T35.6@82.754,93.131 ; T50.6@87.63,74.085 87.63,73.836 88.686,72.779 88.686,72.081 v1(88.712,72.056) ; T21.6@92.185,112.108 92.185,112.029 93.528,110.685 93.528,110.585 v1(93.554,110.56) ; v1(92.185,129.766) T5.6@92.185,131.108 ; v1(94.742,8.155) v1(94.742,31.524) ; T64.6@97.189,55.182 97.189,54.827 98.26,53.755 98.26,53.361 v1(98.286,53.336) ; v1(101.754,91.789) T36.6@101.754,93.131 ; T51.6@106.645,74.099 106.645,73.819 107.93,72.533 107.93,72.149 v1(107.956,72.124) ; v1@111.185,110.589 T22.6@111.185,112.108 ; v1(111.185,129.766) T6.6@111.185,131.108 ; T65.6@116.189,55.182 116.189,54.827 117.596,53.42 v1(117.596,53.396) ; v1(120.754,91.789) T37.6@120.754,93.131 ; T52.6@125.603,74.083 125.603,73.863 127.096,72.369 127.096,72.117 v1(127.122,72.092) ; v1@130.185,110.589 T23.6@130.185,112.108 ; v1(130.185,129.766) T7.6@130.185,131.108 ; T66.6@135.189,55.182 135.189,54.827 136.248,53.767 136.248,53.451 v1(136.274,53.426) ; T78.6@137.471,36.139 139.235,36.139 139.827,36.731 139.827,42.504 141.732,44.409 v1(141.732,53.368) ; v1(139.754,91.789) T38.6@139.754,93.131 ; T53.6@144.643,74.097 144.643,73.821 146.14,72.323 146.14,72.093 v1(146.166,72.068) ; v1@149.185,110.589 T24.6@149.185,112.108 ; v1(149.185,129.766) T8.6@149.185,131.108 ; T67.6@154.189,55.182 154.189,54.827 155.236,53.779 155.236,53.451 v1(155.262,53.426) ; v1(158.754,91.789) T39.6@158.754,93.131 ; T54.6@163.632,74.112 163.632,73.832 165.082,72.381 165.082,72.105 v1(165.108,72.08) ; v1@168.185,110.589 T25.6@168.185,112.108 ; v1(168.185,129.766) T9.6@168.185,131.108 ; T68.6@173.189,55.182 173.189,54.825 174.446,53.567 174.446,53.431 v1(174.472,53.406) ; v1(177.754,91.789) T40.6@177.754,93.131 ; Q1.3@178.755,28.288 Q1.3@178.816,28.349 ; v1(178.816,8.155) Q1.3@178.816,28.349 ; v4(178.816,32.667) Q1.3@178.816,28.349 ; T55.6@182.626,74.081 182.626,73.838 184.132,72.331 184.132,72.105 v1(184.158,72.08) ; v1@187.185,110.589 T26.6@187.185,112.108 ; v1(187.185,129.766) T10.6@187.185,131.108 ; T69.6@192.189,55.182 192.189,54.827 193.466,53.549 193.466,53.391 v1(193.492,53.366) ; v1(196.754,91.789) T41.6@196.754,93.131 ; T56.6@201.645,74.099 201.645,73.819 203.146,72.317 203.146,72.071 v1(203.172,72.046) ; T79.6@206.184,36.106 207.668,36.106 208.254,35.52 v1(208.254,34.242) ; v1@206.185,110.589 T27.6@206.185,112.108 ; v1(206.185,129.766) T11.6@206.185,131.108 ; T70.6@211.189,55.182 211.189,54.825 212.394,53.619 212.394,53.401 v1(212.42,53.376) ; v1(215.754,91.789) T42.6@215.754,93.131 ; T57.6@220.599,74.079 220.599,73.867 221.78,72.685 221.78,72.089 v1(221.806,72.064) ; v1@225.185,110.57 225.185,110.589 T28.6@225.185,112.108 ; v1(225.185,129.766) T12.6@225.185,131.108 ; v1@225.564,34.325 T80.6@225.564,36.132 ; T71.6@230.389,55.182 230.389,54.255 v1(231.278,53.366) ; v1(234.754,91.789) T43.6@234.754,93.131 ; T58.6@239.641,74.095 239.641,73.823 240.506,72.958 240.506,72.137 v1(240.531,72.111) ; v1@244.185,110.589 T29.6@244.185,112.108 ; v1(244.185,129.766) T13.6@244.185,131.108 ; v1(244.564,34.359) T81.6@244.564,36.132 ; T44.6@253.754,93.131 253.754,93 255.018,91.736 v1(255.018,91.732) ; T72.6@256.489,55.182 257.634,54.037 v1@257.634,53.384 ; v1(263.185,129.766) T14.6@263.185,131.108 ; v1@263.564,34.325 T82.6@263.564,36.132 ; T59.6@270.532,74.112 270.532,74.08 270.857,73.755 271.461,73.755 271.862,73.354 v1(271.862,72.542) ; T30.6@272.623,112.106 272.623,112.031 272.948,111.706 273.292,111.706 273.585,111.413 v1(273.585,110.563) ; T45.6@277.483,93.106 278.89,93.106 279.47,92.526 v1(279.47,91.698) ; v1(282.185,129.766) T15.6@282.185,131.108 ; v1@282.564,34.325 T83.6@282.564,36.132 ; T73.6@282.579,55.182 283.063,54.697 283.063,54.155 283.796,53.422 v1(283.796,53.386) ; v1@301.178,34.325 T84.6@301.178,36.132 ; T74.6@301.178,55.182 301.178,55.038 302.8,53.416 v1(302.834,53.416) ; T60.6@301.185,74.106 301.504,73.786 302.939,73.786 303.232,73.493 303.232,73.079 303.225,73.073 303.225,72.563 v1(303.244,72.545) ; v1(301.185,91.789) T46.6@301.185,93.106 T46.6@301.185,93.131 ; v1@301.185,110.589 T31.6@301.185,112.108 ; T16.6@301.185,131.108 T16.6@301.185,131.106 v1(301.185,129.766) 313.873,129.766 314.325,129.314 v1(314.325,110.645) v1(314.325,91.849) v1(314.325,72.545) v1(314.325,53.368) v1(314.325,34.318)
  Bottom Layer w0.5: v1(28.287,53.373) 28.287,53.368 32.258,53.368 36.322,49.304 42.926,49.304 46.99,53.368 59.182,53.368 v1(59.231,53.417) ; v1(68.752,34.436) 79.003,34.436 81.915,31.524 v1(94.742,31.524) ; v1(94.742,8.155) v1(178.816,8.155) ; v4(178.816,32.667) 178.943,32.54 201.041,32.54 202.819,34.318 205.48,34.318 205.556,34.242 v1(208.254,34.242) ; v1(240.531,72.111) 248.211,72.111 251.841,68.481 263.398,68.481 267.462,72.545 271.859,72.545 v1(271.862,72.542) 271.868,72.548 273.301,72.548 277.055,68.794 293.429,68.794 297.18,72.545 v1(314.325,72.545) ; v1(244.185,110.563) 246.208,110.563 249.936,106.834 264.541,106.834 268.269,110.563 v1(273.585,110.563) 275.799,110.563 279.273,107.089 287.655,107.089 291.084,110.518 v1@301.185,110.518 ; v1(301.185,91.789) 314.265,91.789 v1(314.325,91.849) ; v1@301.208,34.318 v1(314.325,34.318) ; v1@301.221,110.563 314.207,110.563 314.288,110.645 v1(314.325,110.645) ; v1(302.834,53.416) 308.543,53.416 308.591,53.368 v1(314.325,53.368)
  other v1: 225.557,34.318 263.557,34.318 282.557,34.318 301.171,34.318 257.634,53.348 35.185,110.563 111.185,110.563 130.185,110.563 149.185,110.563 168.185,110.563 187.185,110.563 206.185,110.563 225.185,110.57 301.185,110.563
NetR1_1: R1.1 T1.1 | length 11
  Top Layer w0.254: R1.1@4.975,129.193 9.264,129.193 11.845,126.613 T1.1@11.845,123.598
NetR1_2: R1.2 R3.2 R5.2 R7.2 R9.2 R11.2 R13.2 R15.2 R17.2 R19.2 R21.2 R23.2 R25.2 R27.2 R29.2 R31.2 U1.21 | length 262.8
  Top Layer w0.381: R5.2@43.434,128.007 R5.2@43.434,128.134 ; v1(43.434,130.838) R5.2@43.434,128.134 ; R5.2@43.475,128.094 R5.2@43.434,128.134 ; R11.2@100.457,128.007 v1(100.457,130.838) ; R19.2@176.403,128.007 v1(176.403,130.838) ; R29.2@271.399,128.007 v1(271.399,130.838)
  Top Layer w0.5: v1(4.975,131.093) 3.304,131.093 2.794,130.584 2.794,104.676 4.191,103.279 4.191,97.31 6.238,95.263 6.238,72.784 8.509,70.513 8.509,52.485 9.455,51.539 9.455,23.425 9.818,23.062 9.818,22.133 v1(9.844,22.108) ; v1(126.56,17.427) 126.619,17.427 126.619,26.825 127.127,27.333 v1(127.127,32.159)
  Bottom Layer w0.381: v1@176.475,130.782 v1@176.53,130.838
  Bottom Layer w0.5: v1@9.878,22.108 82.11,22.108 82.731,21.487 82.731,21.373 83.026,21.078 83.14,21.078 83.731,20.487 83.731,20.373 84.026,20.078 84.471,20.078 85.344,19.205 113.157,19.205 114.935,17.427 v1(126.56,17.427) ; U1.21@125.603,35.334 125.603,33.683 v1(127.127,32.159)
  other v1: 24.475,131.093 62.475,131.093 81.475,131.093 119.475,131.093 138.475,131.093 157.475,131.093 195.475,131.093 214.475,131.093 233.475,131.093 252.475,131.093 290.475,131.093
NetR2_1: R2.1 T1.3 | length 14
  Top Layer w0.254: T1.3@13.935,131.108 13.935,129.603 14.598,128.94 19.17,128.94 22.994,125.116 R2.1@24.525,125.116
NetR3_1: R3.1 T2.1 | length 10.7
  Top Layer w0.254: R3.1@24.475,129.193 28.695,129.193 30.845,127.044 T2.1@30.845,123.598
NetR4_1: R4.1 T2.3 | length 14.5
  Top Layer w0.254: T2.3@32.935,131.108 32.935,130.161 34.163,128.933 36.576,128.933 42.393,123.116 R4.1@43.525,123.116
NetR5_1: R5.1 T3.1 | length 8.2
  Top Layer w0.254: R5.1@43.475,126.193 48.459,126.193 49.845,124.808 T3.1@49.845,123.598
NetR6_1: R6.1 T3.3 | length 14.1
  Top Layer w0.254: T3.3@51.935,131.108 51.935,129.322 52.324,128.933 56.515,128.933 60.332,125.116 R6.1@62.525,125.116
NetR7_1: R7.1 T4.1 | length 10.7
  Top Layer w0.254: R7.1@62.475,129.193 66.668,129.193 68.845,127.017 T4.1@68.843,123.596
NetR8_1: R8.1 T4.3 | length 13.8
  Top Layer w0.254: T4.3@70.935,131.108 70.935,129.88 72.003,128.812 74.797,128.812 78.493,125.116 R8.1@81.525,125.116
NetR9_1: R9.1 T5.1 | length 10.4
  Top Layer w0.254: R9.1@81.475,129.193 85.21,129.193 87.845,126.559 T5.1@87.845,123.598
NetR10_1: R10.1 T5.3 | length 14.7
  Top Layer w0.254: T5.3@89.935,131.108 89.935,129.676 90.669,128.942 93.717,128.942 99.543,123.116 R10.1@100.525,123.116
NetR11_1: R11.1 T6.1 | length 8.2
  Top Layer w0.254: R11.1@100.475,126.193 105.482,126.193 106.845,124.831 T6.1@106.845,123.598
NetR12_1: R12.1 T6.3 | length 14
  Top Layer w0.254: T6.3@108.935,131.108 108.935,129.599 109.601,128.933 112.395,128.933 116.212,125.116 R12.1@119.525,125.116
NetR13_1: R13.1 T7.1 | length 10
  Top Layer w0.254: R13.1@119.475,129.193 122.548,129.193 125.845,125.897 T7.1@125.845,123.598
NetR14_1: R14.1 T7.3 | length 14
  Top Layer w0.254: T7.3@127.935,131.108 127.935,129.522 128.575,128.882 131.242,128.882 135.008,125.116 R14.1@138.525,125.116
NetR15_1: R15.1 T8.1 | length 10.9
  Top Layer w0.254: R15.1@138.475,129.193 142.995,129.193 144.845,127.344 T8.1@144.845,123.598
NetR16_1: R16.1 T8.3 | length 14
  Top Layer w0.254: T8.3@146.935,131.108 146.935,129.572 147.685,128.822 150.352,128.822 154.058,125.116 R16.1@157.525,125.116
NetR17_1: R17.1 T9.1 | length 10.6
  Top Layer w0.254: R17.1@157.475,129.193 161.537,129.193 163.845,126.886 T9.1@163.845,123.598
NetR18_1: R18.1 T9.3 | length 14.8
  Top Layer w0.254: T9.3@165.935,131.108 165.935,129.622 166.595,128.962 169.262,128.962 175.108,123.116 R18.1@176.525,123.116
NetR19_1: R19.1 T10.1 | length 7.4
  Top Layer w0.254: R19.1@176.475,126.193 180.174,126.193 182.77,123.598 T10.1@182.845,123.598
NetR20_1: R20.1 T10.3 | length 13.8
  Top Layer w0.254: T10.3@184.935,131.108 184.935,129.926 185.831,129.03 189.133,129.03 193.047,125.116 R20.1@195.525,125.116
NetR21_1: R21.1 T11.1 | length 9.9
  Top Layer w0.254: R21.1@195.475,129.193 198.367,129.193 201.845,125.716 T11.1@201.845,123.598
NetR22_1: R22.1 T11.3 | length 14
  Top Layer w0.254: T11.3@203.935,131.108 203.935,129.468 204.441,128.962 207.489,128.962 211.335,125.116 R22.1@214.525,125.116
NetR23_1: R23.1 T12.1 | length 9.8
  Top Layer w0.254: R23.1@214.475,129.193 217.163,129.193 220.845,125.512 T12.1@220.845,123.598
NetR24_1: R24.1 T12.3 | length 13.9
  Top Layer w0.254: T12.3@222.935,131.108 222.935,129.772 223.745,128.962 226.158,128.962 230.004,125.116 R24.1@233.525,125.116
NetR25_1: R25.1 T13.1 | length 10.4
  Top Layer w0.254: R25.1@233.475,129.193 237.229,129.193 239.845,126.578 T13.1@239.845,123.598
NetR26_1: R26.1 T13.3 | length 13.8
  Top Layer w0.254: T13.3@241.935,131.108 241.935,129.822 242.835,128.922 245.756,128.922 249.562,125.116 R26.1@252.525,125.116
NetR27_1: R27.1 T14.1 | length 10.1
  Top Layer w0.254: R27.1@252.475,129.193 255.644,129.193 258.845,125.993 T14.1@258.843,123.596
NetR28_1: R28.1 T14.3 | length 14.6
  Top Layer w0.254: T14.3@260.935,131.108 260.935,129.872 261.925,128.882 264.465,128.882 270.231,123.116 R28.1@271.525,123.116
NetR29_1: R29.1 T15.1 | length 8.1
  Top Layer w0.254: R29.1@271.475,126.193 276.424,126.193 277.845,124.773 T15.1@277.845,123.598
NetR30_1: R30.1 T15.3 | length 13.8
  Top Layer w0.254: T15.3@279.935,131.108 279.935,129.922 280.945,128.912 283.612,128.912 287.408,125.116 R30.1@290.525,125.116
NetR31_1: R31.1 T16.1 | length 9.8
  Top Layer w0.254: R31.1@290.475,129.193 293.109,129.193 296.845,125.458 T16.1@296.845,123.596
NetR32_1: R32.1 T16.3 | length 15
  Top Layer w0.254: T16.3@298.935,131.108 298.935,129.591 299.534,128.992 301.693,128.992 305.569,125.116 R32.1@310.525,125.116
NetR33_1: R33.1 T17.1 | length 10.4
  Top Layer w0.254: R33.1@4.975,110.193 8.325,110.193 11.845,106.674 T17.1@11.845,104.598
NetR33_2: R33.2 R35.2 R37.2 R39.2 R41.2 R43.2 R45.2 R47.2 R49.2 R51.2 R53.2 R55.2 R57.2 R59.2 R61.2 U1.22 | length 285.5
  Top Layer w0.381: v1@289.566,118.265 290.475,117.356 R61.2@290.475,112.093
  Top Layer w0.5: v1(4.975,112.093) 4.725,111.843 3.849,111.843 3.556,111.551 3.556,105.565 5.334,103.787 5.334,97.437 7.058,95.713 7.058,73.234 9.398,70.894 9.398,62.004 11.31,60.092 11.31,47.819 10.481,46.99 10.481,42.573 10.782,42.272 10.782,21.3 v1(10.782,21.286) ; v1(128.27,16.03) 128.27,18.951 129.54,20.221 v1(129.54,32.54)
  Bottom Layer w0.381: v1(252.475,112.093) 252.475,114.707 258.317,120.55 287.275,120.55 v1(289.56,118.265)
  Bottom Layer w0.5: v1(10.782,21.286) 10.782,21.3 45.763,21.3 45.817,21.354 81.798,21.354 81.977,21.175 81.977,21.06 82.714,20.324 82.828,20.324 82.977,20.175 82.977,20.06 83.714,19.324 83.828,19.324 85.344,17.808 112.395,17.808 114.173,16.03 v1(128.27,16.03) ; U1.22@128.143,35.334 128.32,35.157 128.32,33.76 v1(129.54,32.54)
  other v1: 24.475,112.093 43.475,112.093 62.475,112.093 81.475,112.093 100.475,112.093 119.475,112.093 138.475,112.093 157.475,112.093 176.475,112.093 195.475,112.093 214.475,112.093 233.475,112.093
NetR34_1: R34.1 T17.3 | length 16.4
  Top Layer w0.254: T17.3@13.935,112.108 13.935,110.426 14.521,109.84 16.553,109.84 v1(17.907,108.486) ; v1(24.511,104.93) 24.511,103.13 R34.1@24.525,103.116
  Bottom Layer w0.254: v1(17.907,108.486) 21.463,104.93 v1(24.511,104.93)
NetR35_1: R35.1 T18.1 | length 10.2
  Top Layer w0.254: R35.1@24.475,110.193 27.883,110.193 30.845,107.232 T18.1@30.845,104.598
NetR36_1: R36.1 T18.3 | length 18.5
  Top Layer w0.254: T18.3@32.935,112.108 32.935,110.222 33.409,109.748 36.33,109.748 v1(37.719,108.359) ; R36.1@43.525,103.116 43.561,103.151 v1(43.561,108.359)
  Bottom Layer w0.254: v1(37.719,108.359) v1(43.561,108.359)
NetR37_1: R37.1 T19.1 | length 10.3
  Top Layer w0.254: R37.1@43.475,110.193 47.06,110.193 49.845,107.409 T19.1@49.845,104.598
NetR38_1: R38.1 T19.3 | length 18.5
  Top Layer w0.254: T19.3@51.935,112.108 51.935,110.399 52.416,109.918 55.083,109.918 v1(55.626,109.375) ; v1(62.484,108.613) 62.484,103.157 R38.1@62.525,103.116
  Bottom Layer w0.254: v1(55.626,109.375) 58.166,109.375 58.928,108.613 v1(62.484,108.613)
  other v2: 53.104,107.248
NetR39_1: R39.1 T20.1 | length 10.7
  Top Layer w0.254: R39.1@62.475,110.193 66.745,110.193 68.845,108.094 T20.1@68.845,104.598
NetR40_1: R40.1 T20.3 | length 17.7
  Top Layer w0.254: T20.3@70.935,112.108 70.935,111.107 72.05,109.991 74.313,109.991 v1(74.93,109.375) ; v1(79.883,109.375) 79.883,104.758 80.952,103.689 80.952,103.489 81.325,103.116 R40.1@81.525,103.116
  Bottom Layer w0.254: v1(74.93,109.375) 79.756,109.375 v1(79.883,109.375)
  other v2: 72.104,107.25
NetR41_1: R41.1 T21.1 | length 10.4
  Top Layer w0.254: R41.1@81.475,110.193 85.16,110.193 87.845,107.509 T21.1@87.845,104.598
NetR42_1: R42.1 T21.3 | length 17
  Top Layer w0.254: T21.3@89.933,112.106 89.933,112.101 90.381,111.653 90.736,111.653 93.015,109.375 v1(94.615,109.375) ; v1(98.806,109.375) 100.525,107.655 R42.1@100.525,103.116
  Bottom Layer w0.254: v1(94.615,109.375) v1(98.806,109.375)
  other v2: 91.104,107.25
NetR43_1: R43.1 T22.1 | length 10.5
  Top Layer w0.254: R43.1@100.475,110.193 104.337,110.193 106.845,107.686 T22.1@106.845,104.598
NetR44_1: R44.1 T22.3 | length 17.2
  Top Layer w0.254: T22.3@108.935,112.108 108.935,110.59 109.761,109.764 113.022,109.764 v1(113.411,109.375) ; v1(116.713,109.375) 119.525,106.562 R44.1@119.525,103.116
  Bottom Layer w0.254: v1(113.411,109.375) v1(116.713,109.375)
  other v2: 110.104,107.25
NetR45_1: R45.1 T23.1 | length 10.8
  Top Layer w0.254: R45.1@119.475,110.193 123.895,110.193 125.845,108.244 T23.1@125.845,104.598
NetR46_1: R46.1 T23.3 | length 18.4
  Top Layer w0.254: T23.3@127.935,112.108 127.935,110.588 128.712,109.812 131.897,109.812 v1(133.096,108.613) ; v1(138.43,108.613) 138.43,103.211 R46.1@138.525,103.116
  Bottom Layer w0.254: v1(133.096,108.613) v1(138.43,108.613)
NetR47_1: R47.1 T24.1 | length 10.9
  Top Layer w0.254: R47.1@138.475,110.193 142.945,110.193 144.845,108.294 T24.1@144.845,104.598